# Altium PCB B049-140W-3C1A 外挂FTF屏1.3寸.PcbDoc (part 1 of 2)
Units mm, origin at the board's own origin, x right, y up, seen from the top; angles counter-clockwise.
Board outline 62.01 x 27.28 mm, 4 copper layers (Top Layer, Mid-Layer 1, Mid-Layer 2, Bottom Layer); 141 components, 212 nets, 519 pads, 593 vias.
Unrouted connection lines stored in the file: 27.
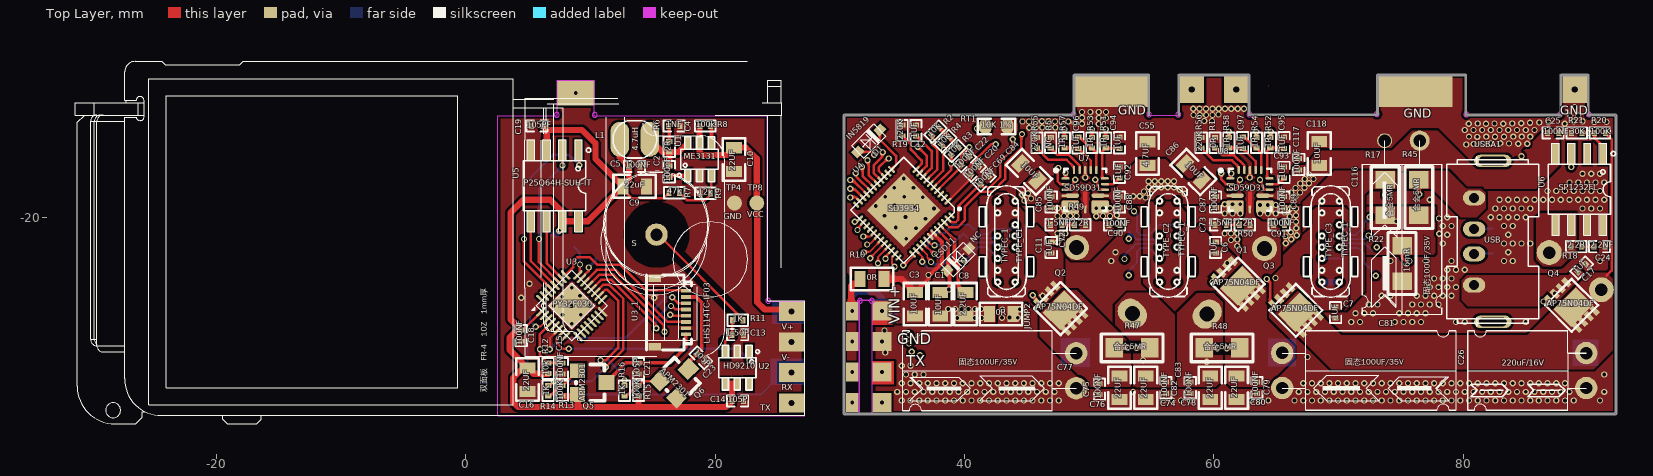
[diagram p0: Top Layer view]
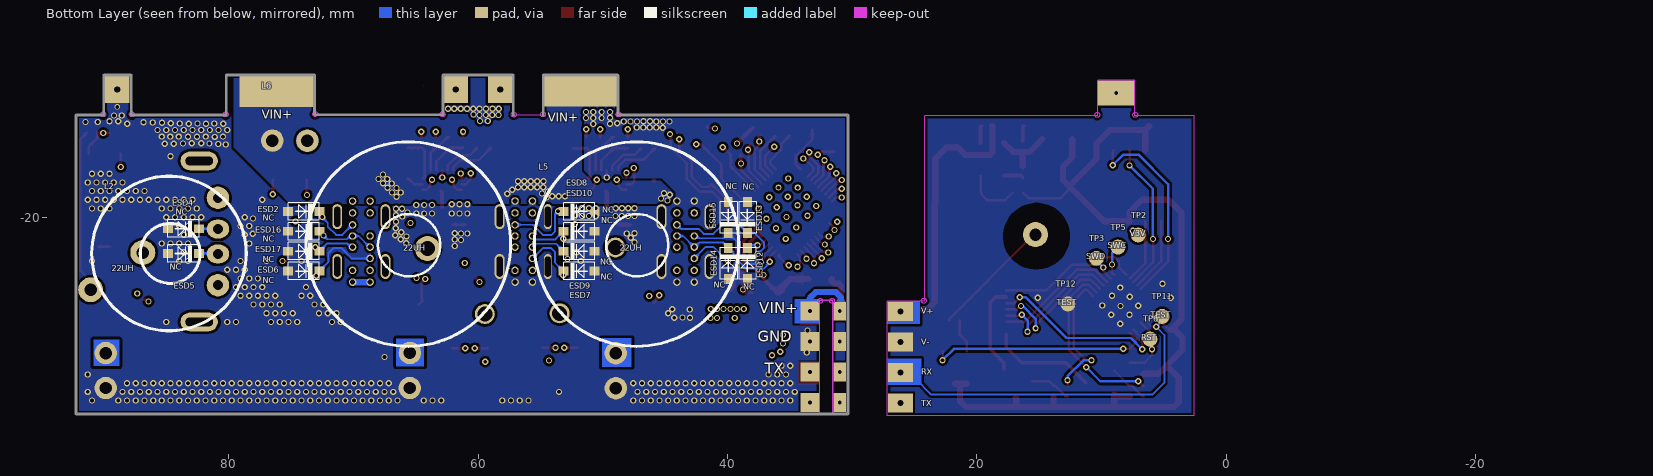
[diagram p1: Bottom Layer view, seen from below]
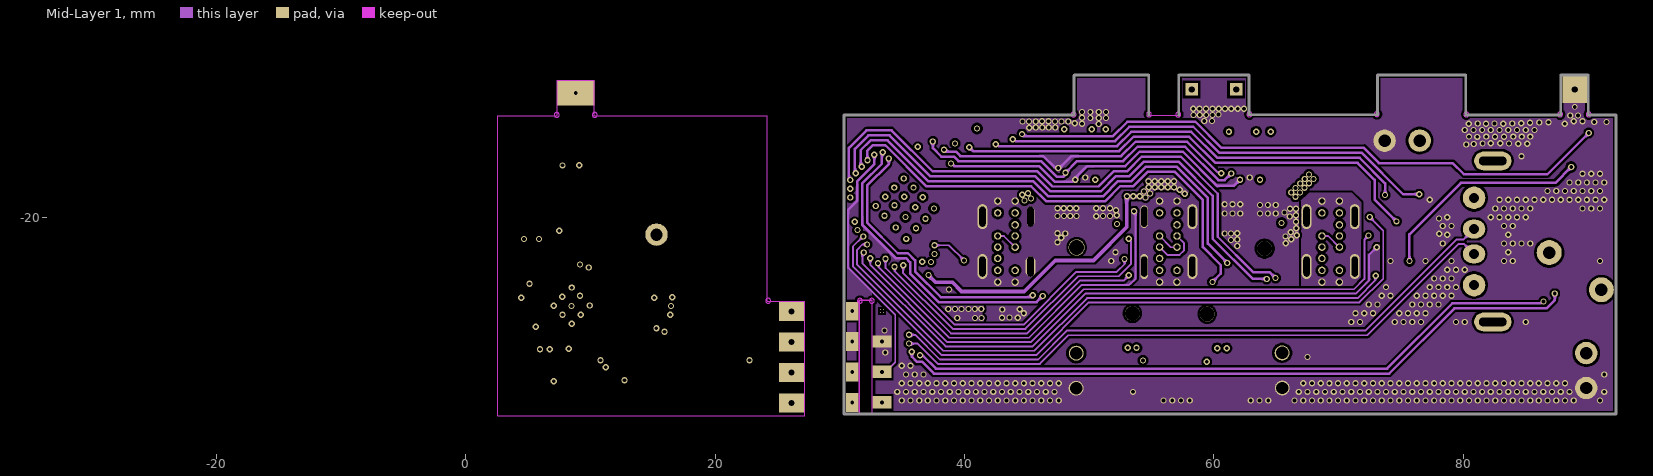
[diagram p2: Mid-Layer 1]
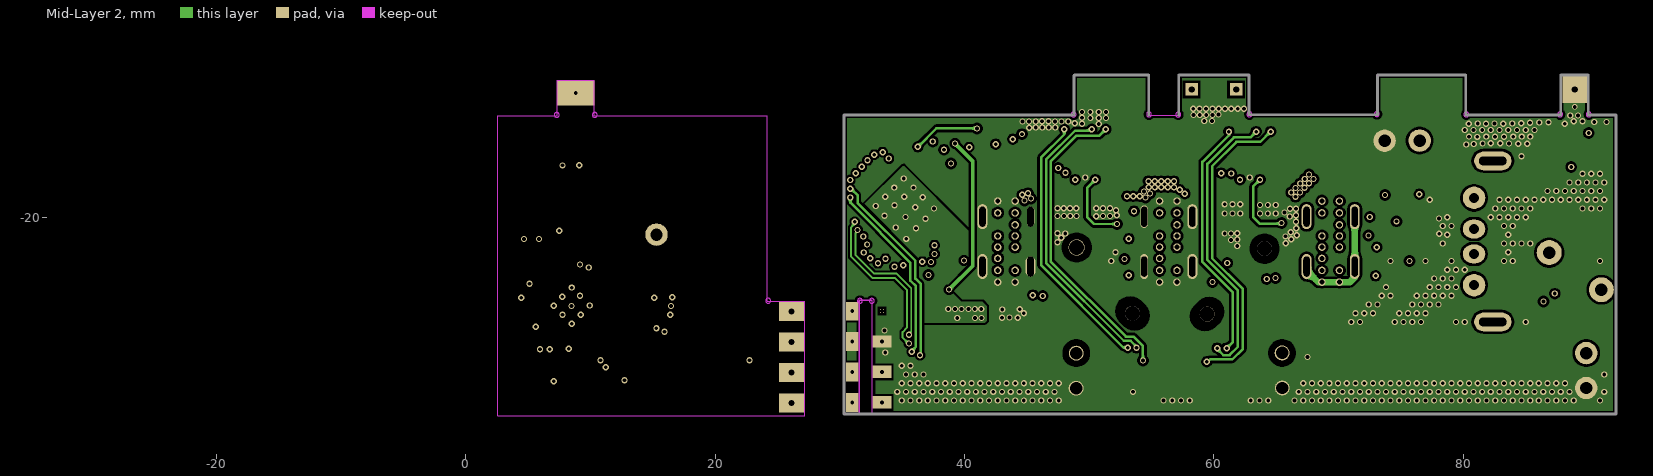
[diagram p3: Mid-Layer 2]

## Layer stack, top to bottom
Top Solder: solder mask 0.0102, Solder Resist, Dk 3.5
Top Layer: signal copper 0.0356
Dielectric 1: dielectric 0.32, FR-4, Dk 4.8
Mid-Layer 1: signal copper 0.0356
Dielectric2: dielectric 0.32, FR-4, Dk 4.8
Mid-Layer 2: signal copper 0.0356
Dielectric3: dielectric 0.32, FR-4, Dk 4.8
Bottom Layer: signal copper 0.0356
Bottom Solder: solder mask 0.0102, Solder Resist, Dk 3.5

## Board outline
30.289,-34.265 cw(c30.334,-34.242) 30.284,-34.242 30.284,-27.059 cw(c30.334,-27.059) 30.289,-27.037 30.289,-11.778 cw(c30.34,-11.778) 30.34,-11.728 48.739,-11.728 48.739,-8.578 cw(c48.79,-8.578) 48.79,-8.528 54.765,-8.528 cw(c54.765,-8.578) 54.815,-8.578 54.815,-11.778 cw(c54.765,-11.778) 54.714,-11.778 54.714,-8.629 48.84,-8.629 48.84,-11.778 cw(c48.79,-11.778) 48.79,-11.829 30.39,-11.829 30.39,-35.703 92.189,-35.703 92.189,-11.829 90.015,-11.829 cw(c90.015,-11.778) 89.964,-11.778 89.964,-8.629 87.865,-8.629 87.865,-11.778 cw(c87.815,-11.778) 87.815,-11.829 80.19,-11.829 cw(c80.19,-11.778) 80.139,-11.778 80.139,-8.629 73.165,-8.629 73.165,-11.753 cw(c73.115,-11.753) 73.115,-11.804 62.815,-11.804 cw(c62.815,-11.753) 62.764,-11.753 62.764,-8.629 57.24,-8.629 57.24,-11.778 cw(c57.19,-11.778) 57.139,-11.778 57.139,-8.578 cw(c57.19,-8.578) 57.19,-8.528 62.815,-8.528 cw(c62.815,-8.578) 62.865,-8.578 62.865,-11.703 73.064,-11.703 73.064,-8.578 cw(c73.115,-8.578) 73.115,-8.528 80.19,-8.528 cw(c80.19,-8.578) 80.24,-8.578 80.24,-11.728 87.764,-11.728 87.764,-8.578 cw(c87.815,-8.578) 87.815,-8.528 90.015,-8.528 cw(c90.015,-8.578) 90.065,-8.578 90.065,-11.728 92.24,-11.728 cw(c92.24,-11.778) 92.29,-11.778 92.29,-35.753 cw(c92.24,-35.753) 92.24,-35.804 30.34,-35.804 cw(c30.34,-35.753) 30.289,-35.753
cut-out: 31.565,-35.753 32.615,-35.753 32.615,-26.628 31.565,-26.628

## Design rules (kind name [scope] priority, off if disabled: settings)
Clearance [All] p1: gap=0.2 ignorepadtopadclearanceinfootprint=FALSE
ComponentClearance [All] p1: gap=0.05 collisioncheckmode=3 verticalgap=0.05 showdistances=FALSE
PlaneConnect [All] p1: planeconnectstyle=Direct reliefexpansion=0.508 reliefentries=4 reliefconductorwidth=0.254 reliefairgap=0.254
PolygonConnect [All] p1: connectstyle=Direct reliefconductorwidth=0.254 reliefentries=4 polygonreliefangle="90 Angle" airgapwidth=0.254
RoutingVias [All] p1: holewidth=0.3 width=0.5 viastyle="Through Hole" minholewidth=0.3 minwidth=0.5 maxholewidth=0.3 maxwidth=0.5
SolderMaskExpansion [All] p1: expansion=0.102 istentingtop=FALSE
Width [All] p1: maxlimit=1 minlimit=0.1 preferedwidth=0.2 minimp=50.000000 maximp=50.000000 favimp=50.000000
28 further rules are at their usual default settings.

## Components (designator, comment, footprint, x,y, rotation, side; value= is the part's Value field where it differs from the comment)
C1 "10UF" "C 0805_L" 38.06,-26.95 r90 top
C2 "100nF" "C 0402_L" 16.32,-16.33 r270 top
C3 "10UF" "C 0805_L" 36.03,-26.95 r90 top
C4 "1NF" "C 0402_L" 16.715,-12.66 r180 top
C5 "100NF" "C 0402_L" 13.54,-15.9 r180 top
C6 "1UF" "C 0402_L" 60.14,-22.41 r270 top
C7 "1UF" "C 0402_L" 69.76,-27.61 r90 top
C8 "2.2UF" "C 0805_L" 40.08,-26.95 r90 top
C9 "22uF" "C 0805_L" 13.55,-17.5 r180 top
C10 "22UF" "C 0805_L" 21.51,-15.35 r270 top
C11 "1UF" "C 0402_L" 46.958,-22.41 r270 top
C12 "1UF" "C 0402_L" 36.11,-13.02 r270 top
C13 "1-50P" "C 0402_L" 21.808,-29.39 r180 top
C14 "105P" "C 0402_L" 21.808,-34.71 r0 top
C15 "100NF" "C 0402_L" 7.74,-32.1 r90 top
C16 "22UF" "C 0805_L" 4.95,-33 r90 top
C17 "1UF" "C 0402_L" 89.49,-24.04 r225 top
C18 "100NF" "C 0402_L" 4.45,-29.47 r90 top
C19 "105PF" "C 0402_L" 5.73,-12.66 r180 top
C20 "100NF" "C 0402_L" 40.816,-16.223 r45 top
C21 "105P" "C 0402_L" 13.853,-32.1 r90 top
C22 "100NF" "C 0402_L" 40.037,-15.443 r45 top
C23 "105P" "C 0402_L" 18.852,-31.252 r135 top
C24 "2.2NF" "C 0402_L" 90.93,-22.33 r180 top
C25 "100NF" "C 0402_L" 87.21,-13.21 r180 top
C26 "220uF/16V" 6*8W 89.86,-33.67 r180 top
C55 "4.7UF" "C 0805_L" 54.68,-14.87 r90 top
C69 "100NF" "C 0402_L" 41.6,-17 r45 top
C72 "1.5NF" "C 0402_L" 47.357,-20.578 r0 top
C73 "1.5NF" "C 0402_L" 60.54,-20.578 r0 top
C74 "22UF" "C 0805_L" 54.54,-33.65 r90 top
C75 "100NF" "C 0402_L" 50.82,-33.76 r90 top
C76 "22UF" "C 0805_L" 52.43,-33.65 r90 top
C77 "固态100UF/35V" 6*12W#1 47.05,-35.49 r180 top locked
C78 "22UF" "C 0805_L" 59.71,-33.65 r90 top
C79 "100NF" "C 0402_L" 63.45,-33.65 r90 top
C80 "22UF" "C 0805_L" 61.82,-33.65 r90 top
C81 "固态100UF/35V" 6*12W#2 67.38,-35.47 r0 top
C82 "100NF" "C 0402_L" 56.15,-33.65 r90 top
C83 "100NF" "C 0402_L" 58.1,-33.65 r90 top
C84 "10UF" "C 0805_L" 45.168,-16.348 r315 top
C85 "100NF" "C 0402_L" 46.958,-18.758 r90 top
C86 "10UF" "C 0805_L" 58.35,-16.348 r315 top
C87 "100NF" "C 0402_L" 60.14,-18.758 r90 top
C88 "100NF" "C 0402_L" 52.427,-18.758 r90 top
C89 "100NF" "C 0402_L" 65.63,-18.758 r90 top
C90 "100NF" "C 0402_L" 52.037,-20.578 r180 top
C91 "100NF" "C 0402_L" 65.23,-20.578 r180 top
C92 "1UF" "C 0402_L" 52.427,-16.379 r90 top
C93 "1UF" "C 0402_L" 65.63,-16.379 r90 top
C94 "1UF" "C 0402_L" 52.427,-14 r90 top
C95 "1UF" "C 0402_L" 65.63,-13.995 r90 top
C96 "1UF" "C 0402_L" 49.112,-14 r90 top
C97 "1UF" "C 0402_L" 62.305,-13.995 r90 top
C116 "固态100UF/35V" 6*12W#3 71.89,-15.74 r270 top locked
C117 "100NF" "C 0402_L" 66.8,-15.73 r270 top
C118 "10UF" "C 0805_L" 68.45,-14.86 r270 top
D1 "IN5819" SOD-323 32.25,-13.92 r45 top
ESD2 "NC" SOD-323 74.08,-19.51 r180 bottom
ESD4 "NC" SOD-323 83.73,-20.89 r180 bottom
ESD5 "NC" SOD-323 83.73,-22.88 r180 bottom
ESD6 "NC" SOD-323 74.08,-24.29 r180 bottom
ESD7 "NC" SOD-323 51.8,-24.29 r0 bottom
ESD8 "NC" SOD-323 51.8,-19.51 r0 bottom
ESD9 "NC" SOD-323 51.8,-22.697 r0 bottom
ESD10 "NC" SOD-323 51.8,-21.103 r0 bottom
ESD11 "NC" SOD-323 39.56,-23.28 r225 top
ESD12 "NC" SOD-323 38.4,-23.78 r90 bottom
ESD13 "NC" SOD-323 38.4,-19.9 r270 bottom
ESD14 "NC" SOD-323 39.93,-23.78 r90 bottom
ESD15 "NC" SOD-323 39.93,-19.9 r270 bottom
ESD16 "NC" SOD-323 74.08,-21.103 r180 bottom
ESD17 "NC" SOD-323 74.08,-22.697 r180 bottom
JUMP2 "0R" "R 0805_L" 42.94,-27.73 r0 top
L1 "4.7uH" CD32 13.55,-13.72 r180 top
L2 "22UH" 040125 84.69,-22.878 r270 bottom locked
L5 "22UH" 050125#1 47.29,-22.128 r225 bottom locked
L6 "22UH" 050125#2 65.59,-22.128 r225 bottom locked
Q1 "AP75N04DF" DFN3*3 62.151,-25.374 r135 top
Q2 "AP75N04DF" DFN3*3 47.911,-27.334 r135 top
Q3 "AP75N04DF" DFN3*3 66.783,-27.472 r135 top
Q4 "AP75N04DF" DFN3*3 88.904,-27.071 r135 top
Q5 "APM2301" SOT23-MOS 9.64,-33.151 r270 top
Q6 "APM2301" SOT23-MOS 16.64,-33.26 r315 top
R1 "0R" "R 0402_L" 60.088,-14.02 r90 top
R2 "10K" "R 0402_L" 37.68,-13.08 r225 top
R3 "10K" "R 0402_L" 39.26,-14.65 r225 top
R4 "10K" "R 0402_L" 38.48,-13.85 r225 top
R5 "NC" "R 0402_L" 46.907,-14.025 r90 top
R6 "2R" "R 0402_L" 16.32,-14.29 r270 top
R7 "47k" "R 0402_L" 16.74,-18.01 r180 top
R8 "100k" "R 0402_L" 19.22,-12.66 r180 top
R9 "12k" "R 0402_L" 19.17,-18.05 r0 top
R10 "0R" "R 0805_L" 32.58,-24.93 r0 top
R11 "1K" "R 0402_L" 21.783,-28.24 r0 top
R12 "10k" "R 0402_L" 6.61,-32.075 r270 top
R13 "100K" "R 0402_L" 7.74,-33.873 r270 top
R14 "1K" "R 0402_L" 6.61,-33.873 r270 top
R15 "100K" "R 0402_L" 13.854,-33.873 r270 top
R16 "1K" "R 0402_L" 12.724,-33.873 r270 top
R17 "合金5MR" "R 1206_L" 73.74,-18.378 r270 top
R18 "2.2R" "R 0402_L" 89.04,-22.33 r0 top
R19 "220K" "R 0402_L" 35,-12.99 r270 top
R20 "100K" "R 0402_L" 90.935,-13.21 r0 top
R21 "30K" "R 0402_L" 89.12,-13.21 r180 top
R22 "16mR" "R 1206_L" 75.09,-23.71 r90 top
R45 "合金5MR" "R 1206_L" 76.43,-18.378 r270 top
R47 "合金5MR" "R 1206_L" 53.42,-30.45 r0 top
R48 "合金5MR" "R 1206_L" 60.68,-30.45 r180 top
R49 "2.2R" "R 0402_L" 49.288,-20.578 r180 top
R50 "2.2R" "R 0402_L" 62.49,-20.578 r180 top
R51 "1R" "R 0402_L" 51.318,-13.975 r270 top
R52 "1R" "R 0402_L" 64.522,-13.97 r270 top
R53 "1R" "R 0402_L" 50.215,-13.975 r270 top
R54 "1R" "R 0402_L" 63.413,-13.97 r270 top
R55 "220K" "R 0402_L" 45.804,-14.025 r90 top
R56 "220K" "R 0402_L" 58.98,-14.02 r90 top
R57 "1R" "R 0402_L" 48.01,-13.975 r270 top
R58 "1R" "R 0402_L" 61.197,-13.97 r270 top
RT1 "10K 1%" NTC1 42.52,-12.69 r0 top
TP2 "V3V" 焊盘1.5*2.5mm 7.06,-21.4 r180 bottom
TP3 "SWD" 焊盘1.5*2.5mm 10.42,-23.27 r180 bottom
TP4 "GND" 焊盘1.5*2.5mm 21.55,-18.84 r0 top
TP5 "SWC" 焊盘1.5*2.5mm 8.69,-22.37 r180 bottom
TP6 "RST" 焊盘1.5*2.5mm 6.12,-29.75 r180 bottom
TP8 "VCC" 焊盘椭圆 23.34,-18.84 r0 top
TP11 "TEST" 焊盘椭圆 5.14,-27.93 r180 bottom
TP12 "TEST" 焊盘椭圆 12.7,-26.93 r180 bottom
TYPE_C1 "TYPEC_1" "TP-14pin 180°"#1 43.365,-21.93 r90 top locked
TYPE_C2 "TYPEC_1" "TP-14pin 180°"#2 56.34,-21.93 r90 top locked
TYPE_C3 "TYPEC_1" "TP-14pin 180°"#3 69.365,-21.93 r90 top locked
U1 "ME3131" SOT23-6 18.77,-15.33 r90 top
U2 "HD9210" SOT23-6 21.76,-32.03 r270 top
U3 "PY32F030" "QFN32 4*4" 6.025,-27.565 r315 top
U3_1 "LHS114TC-IF03" FPC-SMD_8P-P0.BD_FPC-SMD_8P-P0.BD() 16.398,-27.618 r90 top locked (schematic designator U3)
U4 "SD3934" QFN52L6*6 35.05,-20.14 r135 top
U5 "P25Q64H-SUH-IT" SOP8 7.2,-17.48 r270 top
U6 "SP1232FL" SOP8 89.38,-17.76 r270 top
U7 "SD59D31" SD59D31_QFN16 49.728,-17.898 r180 top
U8 "SD59D31" SD59D31_QFN16 62.94,-17.898 r180 top
USBA1 "USB" "USB180 10mm" 82.365,-21.921 r270 top locked

## Footprints (in the part's own frame and the unit in brackets; to place one, negate y for a bottom-side part, rotate by r counter-clockwise, add the part's x,y. Pads: shape width x height; smd on the part's side, far side on the other; paste and mask are expansions set on the pad)
6*8W [mm]
  round 1.8 hole 1: 1(0,-2.8) 2(0,0)
  silkscreen extent 0,-4.6 9.5,1.8
6*12W#1 [mm]
  round 1.8 / inner round 1.2 / far side round 1.8 hole 1: 1(-1.91,-4.61) 2(-1.9,-1.8)
  silkscreen extent -1.91,-6.4 12,0
6*12W#2 [mm]
  round 1.8 / inner round 1.2 / far side round 1.8 hole 1: 1(-1.91,4.61) 2(-1.9,1.8)
  silkscreen extent -1.91,0 12,6.4
6*12W#3 [mm]
  round 1.6 / inner round 1.8 / far side round 1.8 hole 1: 1(-1.91,4.61)
  round 1.2 / inner round 1.8 / far side round 1.8 hole 1: 2(-1.9,1.8)
  silkscreen extent -1.91,0 12,6.4
040125 [mm]
  round 2 hole 1: 1(-0.068,-2.2) 2(2.912,-6.38)
  silkscreen extent -6.2,-6.3 6.2,6.1
050125#1 [mm]
  round 1.6 / inner round 1.3 / far side round 2 hole 1.2: 1(-1.01,-1.394)
  round 1.6 / inner round 1.2 / far side oval 2x2.5 hole 1.2: 2(-0.437,-8.289)
  silkscreen extent -8.2,-8.2 8.2,8.2
050125#2 [mm]
  round 2 / inner round 1.2 / far side round 2 hole 1.2: 1(1.338,0.826)
  round 1.6 / inner round 1.2 / far side oval 2.5x2 hole 1.2: 2(8.303,0.366)
  silkscreen extent -8.2,-8.2 8.2,8.2
"C 0402_L" [mm] "无极性贴片电容         淘宝ID:黄晶宝石"
  rect 0.4x0.5 smd: 1(-0.45,0) 2(0.45,0)
  silkscreen extent -0.85,-0.45 0.85,0.45, body extent -0.5,-0.26 0.5,0.26, height 0.53
"C 0805_L" [mil] "无极性贴片电容                                        淘宝ID:黄晶宝石"
  rect 35x50 smd: 1(-37.4,0) 2(37.4,0)
  silkscreen extent -67,-36 67,36, body extent -39,-24 39,24, height 20
CD32 [mm]
  oval 1.5x2.8 smd: 1(-1.21,0.008) 2(1.19,0.008)
  silkscreen extent -1.76,-1.49 1.74,1.51, body extent -1.78,-1.52 1.63,1.48, height 2.15
DFN3*3 [mm]
  rect 0.8x0.4 smd: D(-1.425,-0.225) D(-1.425,-0.875) D(-1.425,0.425) D(-1.425,1.075) G(1.775,1.075) S(1.775,-0.875) S(1.775,0.425) S(1.775,-0.225)
  rect 2x2.5 smd: D(-0.025,0.125)
  silkscreen extent -1.33,-1.38 1.67,1.62, body extent -1.42,-1.43 1.78,1.67, height 0.8
FPC-SMD_8P-P0.BD_FPC-SMD_8P-P0.BD() [mm]
  rect 0.3x0.8 smd: 1(-1.75,-1.25) 2(-1.25,-1.25) 3(-0.75,-1.25) 4(-0.25,-1.25) 5(0.25,-1.25) 6(0.75,-1.25) 7(1.25,-1.25) 8(1.75,-1.25)
  rect 0.6x1 smd: 9(-2.75,1.25) 10(2.75,1.25)
  silkscreen extent -3,-1.71 3,1.91
NTC1 [mm]
  oval 1x1.3 smd: 1(-0.84,0) 2(0.91,0)
  silkscreen extent -1.47,-0.63 1.53,0.62
"QFN32 4*4" [mm]
  oval 0.2x1 smd: 1(0,0) 2(0.4,0) 3(0.8,0) 4(1.2,0) 5(1.6,0) 6(2,0) 7(2.4,0) 8(2.8,0) 17(2.8,4.2) 18(2.4,4.2) 19(2,4.2) 20(1.6,4.2) 21(1.2,4.2) 22(0.8,4.2) 23(0.4,4.2) 24(0,4.2)
  oval 1x0.2 smd: 9(3.5,0.7) 10(3.5,1.1) 11(3.5,1.5) 12(3.5,1.9) 13(3.5,2.3) 14(3.5,2.7) 15(3.5,3.1) 16(3.5,3.5) 25(-0.7,3.5) 26(-0.7,3.1) 27(-0.7,2.7) 28(-0.7,2.3) 29(-0.7,1.9) 30(-0.7,1.5) 31(-0.7,1.1) 32(-0.7,0.7)
  rect 2.6x2.6 smd: 33(1.4,2.1)
  silkscreen extent -0.6,-0.42 3.4,4.1, body extent -0.59,0.09 3.41,4.09, height 0.57
QFN52L6*6 [mm]
  rect 4.2x4.2 smd: 0(0.47,-0.58)
  oval 0.2x0.6 on Top Overlay: 1(-1.93,-3.58) 13(2.87,-3.58) 27(2.87,2.42)
  oval 0.2x0.7 smd: 2(-1.53,-3.58) 3(-1.13,-3.58) 4(-0.73,-3.58) 5(-0.33,-3.58) 6(0.07,-3.58) 7(0.47,-3.58) 8(0.87,-3.58) 9(1.27,-3.58) 10(1.67,-3.58) 11(2.07,-3.58) 28(2.47,2.42) 29(2.07,2.42) 30(1.67,2.42) 31(1.27,2.42) 32(0.87,2.42) 33(0.47,2.42) 34(0.07,2.42) 35(-0.33,2.42) 36(-0.73,2.42) 37(-1.13,2.42) 38(-1.53,2.42)
  oval 0.2x0.7 on Top Overlay: 12(2.47,-3.58)
  oval 0.6x0.2 on Top Overlay: 14(3.47,-2.98) 40(-2.53,1.82)
  oval 0.7x0.2 on Top Overlay: 15(3.47,-2.58)
  oval 0.7x0.2 smd: 16(3.47,-2.18) 17(3.47,-1.78) 18(3.47,-1.38) 19(3.47,-0.98) 20(3.47,-0.58) 21(3.47,-0.18) 22(3.47,0.22) 23(3.47,0.62) 24(3.47,1.02) 25(3.47,1.42) 41(-2.53,1.42) 42(-2.53,1.02) 43(-2.53,0.62) 44(-2.53,0.22) 45(-2.53,-0.18) 46(-2.53,-0.58) 47(-2.53,-0.98) 48(-2.53,-1.38) 49(-2.53,-1.78) 50(-2.53,-2.18) 51(-2.53,-2.58)
  oval 0.6x0.2 smd: 26(3.47,1.82) 52(-2.53,-2.98)
  oval 0.2x0.6 smd: 39(-1.93,2.42)
  silkscreen extent -2.73,-3.91 3.47,2.42, body extent -2.58,-3.58 3.42,2.42, height 0.9
"R 0402_L" [mm] "1/16W贴片电阻     淘宝ID:黄晶宝石"
  rect 0.4x0.5 smd: 1(-0.4,0) 2(0.45,0)
  silkscreen extent -0.8,-0.45 0.85,0.45, body extent -0.5,-0.25 0.5,0.25, height 0.3
"R 0805_L" [mil] "1/8W贴片电阻"
  rect 35x50 smd: 1(-37.4,0) 2(37.4,0)
  silkscreen extent -67,-36 67,36, body extent -39,-25 39,25, height 20
"R 1206_L" [mil] "1/4W贴片电阻"
  rect 55x62 smd: 1(-55.12,0) 2(57.09,0)
  silkscreen extent -96,-44 98,44, body extent -63,-31 63,32, height 22
SD59D31_QFN16 [mm]
  oval 0.65x0.2 smd: 1(1.623,-1.031) 2(1.623,-0.581) 3(1.623,-0.131) 4(1.623,0.344) 8(-1.527,0.344) 9(-1.527,-0.131) 10(-1.527,-0.581) 11(-1.527,-1.031)
  oval 1.075x0.35 smd: 4(1.089,0.344) 8(-0.994,0.344)
  rrect30% 1.4x1.075 smd: 5(1.248,1.254) 7(-1.152,1.254)
  oval 0.2x0.65 smd: 6(0.048,1.444) 12(-0.852,-1.706) 13(-0.402,-1.706) 14(0.048,-1.706) 15(0.498,-1.706) 16(0.948,-1.706)
  Top Layer region: 0.223,1.368 -0.127,1.368 -0.127,0.047 0.223,0.047
  Top Layer region: 0.223,0.047 0.058,-0.118 -0.127,-0.118 -0.127,0.047
  silkscreen extent -1.65,-1.83 2.52,1.57, body extent -1.48,-1.66 1.62,1.44, height 0.85
SOD-323 [mm]
  rect 0.8x0.7 smd: 1(-1.15,0) 2(1.35,0)
  silkscreen extent -1.15,-0.7 1.35,0.7, body extent -1.19,-0.65 1.41,0.65, height 1
SOP8 [mm]
  rect 1.7x0.6 smd: 1(-2.875,1.83) 2(-2.875,0.56) 3(-2.875,-0.71) 4(-2.875,-1.98) 5(2.825,-1.98) 6(2.825,-0.71) 7(2.825,0.56) 8(2.825,1.83)
  silkscreen extent -3.73,-2.58 3.68,2.83, body extent -3.01,-2.52 2.99,2.38, height 1.7
SOT23-6 [mm]
  rect 1x0.5 smd: 1(-1.298,0.964) 2(-1.298,0.014) 3(-1.298,-0.936) 4(1.302,-0.936) 5(1.302,0.014) 6(1.302,0.964)
  silkscreen extent -1.8,-1.49 1.8,1.8, body extent -1.16,-1.37 1.26,1.43, height 1.09
SOT23-MOS [mm]
  rect 1.2x1.3 smd: D(0.075,1.64)
  rect 1.2x1.2 smd: G(-0.865,-0.66) S(1.04,-0.66)
  silkscreen extent -1.37,-0.79 1.55,1.5, body extent -1.41,-0.79 1.59,1.76, height 1
"TP-14pin 180°"#1 [mm]
  round 0.6 hole 0.4: A1(-3.25,0.7) A4(-2.3,0.7) A5(-1.35,0.7) A6(-0.45,0.7) A7(0.45,0.7) A9(2.3,0.7) A12(3.25,0.7) B1(3.25,-0.7) B4(2.3,-0.7) B5(1.35,-0.7) B6(0.45,-0.7) B7(-0.45,-0.7) B9(-2.3,-0.7) B12(-3.25,-0.69)
  oval 1.6x0.6 / inner oval 1.6x0.8 / far side oval 2x0.8 hole 0.5 slot 1.6 at 0 deg: ""(-2,-1.93)
  oval 1.6x0.6 / inner oval 2x0.8 / far side oval 2x0.8 hole 0.5 slot 1.6 at 0 deg: ""(-2,1.93) ""(2,1.93)
  oval 1.6x0.6 / inner oval 1.6x0.6 / far side oval 2x0.8 hole 0.5 slot 1.6 at 0 deg: ""(2,-1.93)
  silkscreen extent -4.46,-2.18 4.47,2.18, body extent -4.5,-1.98 4.5,2.02, height 10
"TP-14pin 180°"#2 [mm]
  round 0.6 hole 0.4: A1(-3.25,0.7) A4(-2.3,0.7) A5(-1.35,0.7) A6(-0.45,0.7) A7(0.45,0.7) A9(2.3,0.7) A12(3.25,0.7) B1(3.25,-0.7) B4(2.3,-0.7) B5(1.35,-0.7) B6(0.45,-0.7) B7(-0.45,-0.7) B9(-2.3,-0.7) B12(-3.25,-0.69)
  oval 1.6x0.6 / inner oval 2x0.8 / far side oval 2x0.8 hole 0.5 slot 1.6 at 0 deg: ""(-2,-1.93) ""(2,-1.93)
  oval 1.6x0.6 / inner oval 2x0.6 / far side oval 2x0.6 hole 0.5 slot 1.6 at 0 deg: ""(-2,1.93)
  oval 1.6x0.6 / inner oval 1.8x0.6 / far side oval 2x0.6 hole 0.5 slot 1.6 at 0 deg: ""(2,1.93)
  silkscreen extent -4.46,-2.18 4.47,2.18, body extent -4.5,-1.98 4.5,2.02, height 10
"TP-14pin 180°"#3 [mm]
  round 0.6 hole 0.4: A1(-3.25,0.7) A4(-2.3,0.7) A5(-1.35,0.7) A6(-0.45,0.7) A7(0.45,0.7) A9(2.3,0.7) A12(3.25,0.7) B1(3.25,-0.7) B4(2.3,-0.7) B5(1.35,-0.7) B6(0.45,-0.7) B7(-0.45,-0.7) B9(-2.3,-0.7) B12(-3.25,-0.69)
  oval 1.6x0.6 / inner oval 2x0.8 / far side oval 2x0.8 hole 0.5 slot 1.6 at 0 deg: ""(-2,-1.93) ""(-2,1.93) ""(2,-1.93) ""(2,1.93)
  silkscreen extent -4.46,-2.18 4.47,2.18, body extent -4.5,-1.98 4.5,2.02, height 10
"USB180 10mm" [mm]
  oval 1.2x1.8 / inner round 1.8 / far side round 1.8 hole 0.8: 1(3.5,-1.5) 4(-3.5,-1.5)
  oval 1.2x1.8 / inner oval 1.5x1.8 / far side oval 1.5x1.8 hole 0.8: 2(1,-1.5) 3(-1,-1.5)
  oval 1x3 / inner oval 1.5x3 / far side oval 1.5x3 hole 0.7 slot 2.2 at 90 deg: ""(-6.46,0) ""(6.45,0)
  silkscreen extent -6.8,-3.7 6.8,3.7, body extent -6.6,-3.02 6.6,2.98, height 10
焊盘1.5*2.5mm [mm]
  round 1.2 smd: 1(0,0)
焊盘椭圆 [mm]
  round 1.2 smd: 1(0,0)

## Part data
C1: library part C-CC, "贴片电容：10UF/10V-X5R-0805", PART NUMBER=003-, TOLERANCE=+-??%, Voltage Rating=??V, LatestRevisionDate=17-Jul-2002, LatestRevisionNote="Re-released for DXP Platform.", PackageDescription="Radial Cap, Thru-Hole; 2 Leads; 0.3 in Pin Spacing", PackageReference=RAD-0.3, PART DESC="CERAMIC CAP", PCB DECAL=CCV5S, Published=8-Jun-2000, Publisher="Altium Limited"
C2: library part 22nF, "贴片电容：100NF/25V-X7R-0402", Contributor=LCEDA_Lib, nameAlias=Value(F), spicePre=C, spiceSymbolName=C_0603_US
C3: library part C-CC, "贴片电容：10UF/50V-X5R-0805", PART NUMBER=003-, TOLERANCE=+-??%, Voltage Rating=??V, LatestRevisionDate=17-Jul-2002, LatestRevisionNote="Re-released for DXP Platform.", PackageDescription="Radial Cap, Thru-Hole; 2 Leads; 0.3 in Pin Spacing", PackageReference=RAD-0.3, PART DESC="CERAMIC CAP", PCB DECAL=CCV5S, Published=8-Jun-2000, Publisher="Altium Limited"
C4: library part C0402, "贴片电容：1NF/50V-X7R-0402", Comment_1=C0402, PCB DECAL=0402
C5 C18: library part 0.1u, "贴片电容：100NF/10V-X5R-0402", Add into BOM=yes, Convert to PCB=yes, Device=0.1u, FootprintName=C0603, ModelId=ac9b32e974bc448eab36b1293f859dcb, ModelName=C0603_L1.6-W0.8-H0.8, ModelTransform=v2:[39.37007874015748,0,0,0,39.37007874015748,0,0,0,39.37007874015748,0.001,0,0], SymbolName=0.1u
  C5: UniqueId=ggeef7817906d228245
  C18: UniqueId=gge4f251fc7ae9908d9
C6 C7 C11 C12 C17 C96 C97: library part C-CC, "贴片电容：1UF/50V-X7R-0402", PART NUMBER=003-, TOLERANCE=+-??%, Voltage Rating=??V, PART DESC="CERAMIC CAP", PCB DECAL=CCV5S
  C6 C7 C11 C17 C96 C97: LatestRevisionDate=17-Jul-2002, LatestRevisionNote="Re-released for DXP Platform.", PackageDescription="Radial Cap, Thru-Hole; 2 Leads; 0.3 in Pin Spacing", PackageReference=RAD-0.3, Published=8-Jun-2000, Publisher="Altium Limited"
C8: library part C-CC, "贴片电容：2.2UF/10V-X5R-0805", PART NUMBER=003-, TOLERANCE=+-??%, Voltage Rating=??V, LatestRevisionDate=17-Jul-2002, LatestRevisionNote="Re-released for DXP Platform.", PackageDescription="Radial Cap, Thru-Hole; 2 Leads; 0.3 in Pin Spacing", PackageReference=RAD-0.3, PART DESC="CERAMIC CAP", PCB DECAL=CCV5S, Published=8-Jun-2000, Publisher="Altium Limited"
C9: "贴片电容：22UF/10V-X7R-0805", Contributor=LCEDA_Lib, nameAlias=Value(F), spicePre=C, spiceSymbolName=C_0805_US
C10: library part 10uF, "贴片电容：22UF/35V-X7R-0805", Contributor=LCEDA_Lib, nameAlias=Value(F), spicePre=C, spiceSymbolName=C_0603_US
C13 C14 C21 C23: library part CAP, "贴片电容：105P/10V-X5R-0402"
C15: library part 10uF, "贴片电容：100NF/10V-X7R-0805", Add into BOM=yes, Convert to PCB=yes, Device=10uF, FootprintName=C0603, ModelId=ac9b32e974bc448eab36b1293f859dcb, ModelName=C0603_L1.6-W0.8-H0.8, ModelTransform=v2:[39.37007874015748,0,0,0,39.37007874015748,0,0,0,39.37007874015748,0.001,0,0], SymbolName=10uF, UniqueId=gge1e13a888c85ebaed
C16: library part 10uF, "贴片电容：22UF/10V-X7R-0805", Add into BOM=yes, Convert to PCB=yes, Device=10uF, FootprintName=C0603, ModelId=ac9b32e974bc448eab36b1293f859dcb, ModelName=C0603_L1.6-W0.8-H0.8, ModelTransform=v2:[39.37007874015748,0,0,0,39.37007874015748,0,0,0,39.37007874015748,0.001,0,0], SymbolName=10uF, UniqueId=gge2649e10512dd5dd7
C19: library part 0.1u, "贴片电容：105P/10V-X5R-0402", Add into BOM=yes, Convert to PCB=yes, Device=0.1u, FootprintName=C0603, ModelId=ac9b32e974bc448eab36b1293f859dcb, ModelName=C0603_L1.6-W0.8-H0.8, ModelTransform=v2:[39.37007874015748,0,0,0,39.37007874015748,0,0,0,39.37007874015748,0.001,0,0], SymbolName=0.1u, UniqueId=ggeeecb535e2993774a
C20 C22 C69 C85 C87 C88 C89 C90 C91 C117: library part C-CC, "贴片电容：100NF/50V-X7R-0402", PART NUMBER=003-, TOLERANCE=+-??%, Voltage Rating=??V, PART DESC="CERAMIC CAP", PCB DECAL=CCV5S
  C20 C22 C69 C85 C87 C88 C89 C90 C91: LatestRevisionDate=17-Jul-2002, LatestRevisionNote="Re-released for DXP Platform.", PackageDescription="Radial Cap, Thru-Hole; 2 Leads; 0.3 in Pin Spacing", PackageReference=RAD-0.3, Published=8-Jun-2000, Publisher="Altium Limited"
C24: library part Cap, "贴片电容：2.2NF/50V-X7R-0402", LatestRevisionDate=17-Jul-2002, LatestRevisionNote="Re-released for DXP Platform.", PackageDescription="Radial Cap, Thru-Hole; 2 Leads; 0.3 in Pin Spacing", PackageReference=RAD-0.3, Published=8-Jun-2000, Publisher="Altium Limited"
C25: library part Cap, "贴片电容：100NF/50V-X7R-0402", LatestRevisionDate=17-Jul-2002, LatestRevisionNote="Re-released for DXP Platform.", PackageDescription="Radial Cap, Thru-Hole; 2 Leads; 0.3 in Pin Spacing", PackageReference=RAD-0.3, Published=8-Jun-2000, Publisher="Altium Limited"
C26: library part "Cap Pol2", "电解电容：220UF/16V 6.3*8mm", LatestRevisionDate=17-Jul-2002, LatestRevisionNote="Re-released for DXP Platform.", PackageDescription="Polarized Capacitor; 2 Leads", PackageReference=POLAR0.8, Published=8-Jun-2000, Publisher="Altium Limited"
C55: library part C-CC, "贴片电容：4.7UF/25V-X5R-0805", PART NUMBER=003-, TOLERANCE=+-??%, Voltage Rating=??V, LatestRevisionDate=17-Jul-2002, LatestRevisionNote="Re-released for DXP Platform.", PackageDescription="Radial Cap, Thru-Hole; 2 Leads; 0.3 in Pin Spacing", PackageReference=RAD-0.3, PART DESC="CERAMIC CAP", PCB DECAL=CCV5S, Published=8-Jun-2000, Publisher="Altium Limited"
C72 C73: library part C-CC, "贴片电容：1.5NF/50V-X7R-0402", PART NUMBER=003-, TOLERANCE=+-??%, Voltage Rating=??V, PART DESC="CERAMIC CAP", PCB DECAL=CCV5S
C74 C76 C78 C80: library part C-CC, "22UF/25V-X5R-0805", PART NUMBER=003-, TOLERANCE=+-??%, Voltage Rating=??V, LatestRevisionDate=17-Jul-2002, LatestRevisionNote="Re-released for DXP Platform.", PackageDescription="Radial Cap, Thru-Hole; 2 Leads; 0.3 in Pin Spacing", PackageReference=RAD-0.3, PART DESC="CERAMIC CAP", PCB DECAL=CCV5S, Published=8-Jun-2000, Publisher="Altium Limited"
C75 C79 C82 C83: library part C-CC, "贴片电容：100NF/25V-X7R-0402", PART NUMBER=003-, TOLERANCE=+-??%, Voltage Rating=??V, LatestRevisionDate=17-Jul-2002, LatestRevisionNote="Re-released for DXP Platform.", PackageDescription="Radial Cap, Thru-Hole; 2 Leads; 0.3 in Pin Spacing", PackageReference=RAD-0.3, PART DESC="CERAMIC CAP", PCB DECAL=CCV5S, Published=8-Jun-2000, Publisher="Altium Limited"
C77 C81 C116: library part C-CE, "插件固态电容：100UF/35V -6*12", PCB DECAL=CE6X11
C84 C86: library part C-CC, "贴片电容：10UF/25V-X7R-0805", PART NUMBER=003-, TOLERANCE=+-??%, Voltage Rating=??V, LatestRevisionDate=17-Jul-2002, LatestRevisionNote="Re-released for DXP Platform.", PackageDescription="Radial Cap, Thru-Hole; 2 Leads; 0.3 in Pin Spacing", PackageReference=RAD-0.3, PART DESC="CERAMIC CAP", PCB DECAL=CCV5S, Published=8-Jun-2000, Publisher="Altium Limited"
C92 C93: library part C-CC, "贴片电容：1UF/10V-X7R-0402", PART NUMBER=003-, TOLERANCE=+-??%, Voltage Rating=??V, LatestRevisionDate=17-Jul-2002, LatestRevisionNote="Re-released for DXP Platform.", PackageDescription="Radial Cap, Thru-Hole; 2 Leads; 0.3 in Pin Spacing", PackageReference=RAD-0.3, PART DESC="CERAMIC CAP", PCB DECAL=CCV5S, Published=8-Jun-2000, Publisher="Altium Limited"
C94 C95: library part C-CC, "贴片电容：1UF/25V-X7R-0402", PART NUMBER=003-, TOLERANCE=+-??%, Voltage Rating=??V, LatestRevisionDate=17-Jul-2002, LatestRevisionNote="Re-released for DXP Platform.", PackageDescription="Radial Cap, Thru-Hole; 2 Leads; 0.3 in Pin Spacing", PackageReference=RAD-0.3, PART DESC="CERAMIC CAP", PCB DECAL=CCV5S, Published=8-Jun-2000, Publisher="Altium Limited"
C118: library part C-CC, "贴片电容：10UF/50V-X7R-0805", PART NUMBER=003-, TOLERANCE=+-??%, Voltage Rating=??V, PART DESC="CERAMIC CAP", PCB DECAL=CCV5S
D1: library part D1
ESD2 ESD4 ESD5 ESD6 ESD7 ESD8 ESD9 ESD10 ESD11 ESD12 ESD13 ESD14 ESD15 ESD16 ESD17: library part ESD1
  ESD2 ESD6 ESD11 ESD16 ESD17: PCB DECAL=0603-CAP
  ESD4 ESD5 ESD7 ESD8 ESD9 ESD10 ESD12 ESD13 ESD14 ESD15: PCB DECAL=DIODE\SMD
JUMP2: library part J, "贴片电阻：0R-0805-F", PCB DECAL=JP5
L1: "贴片电感：0420-4.7UH", Manufacturer=Sunlord, Manufacturer Part=MPH252012S4R7MT, nameAlias=Inductance, spicePre=L, spiceSymbolName=MPH252012S4R7MT, Supplier=LCSC, Supplier Part=C90256
L2: library part L, "磁环电感：040125 22UH 0.7线径 立式加套管"
L5 L6: library part IND-UPRIGHT, "磁环电感：050125-22UH-1.2线径卧套", Code_IEC=1005, Code_JEITA=0402, LatestRevisionDate=29-May-2009, LatestRevisionNote="IPC-7351 Footprint Added.", PackageDescription="Chip Inductor", PackageReference=0402-A, PCB DECAL=FC5T5A, Published=8-Jun-2000, Publisher="Altium Limited"
Q1 Q2 Q3 Q4: library part NMOS, "贴片MOS:AP75N04DF-3*3", PCB DECAL=DFN5_6
Q5 Q6: library part MOS_P, "贴片MOS：APM2301-SOT23-3"
R1: library part RES, "贴片电阻：0R-0402-F", Manufacturer="Generic Components", Class=Passive, PCB DECAL=0603-RES, Published=08/06/2000, Publisher="Altium Hobart Technology Centre", SubClass=Resistor
R2 R3 R4: library part RES, "贴片电阻：10K-0402-F", Manufacturer="Generic Components", Class=Passive, PCB DECAL=0603-RES, Published=08/06/2000, Publisher="Altium Hobart Technology Centre", SubClass=Resistor
R5: library part RES, Manufacturer="Generic Components", Class=Passive, PCB DECAL=0603-RES, Published=08/06/2000, Publisher="Altium Hobart Technology Centre", SubClass=Resistor
R6: library part R0402, "贴片电阻：2R-0402-F", Comment_1=R0402, PCB DECAL=0402
R7: library part 75k, "贴片电阻：47K-0402-1%", Contributor=LCEDA_Lib, nameAlias=Value(Ω), spicePre=R, spiceSymbolName=R_0603_US
R8: "贴片电阻：100K-0402-1%", Contributor=LCEDA_Lib, nameAlias=Value(Ω), spicePre=R, spiceSymbolName=R_0603_US
R9: library part 10k, "贴片电阻：12K-0402-1%", Contributor=LCEDA_Lib, nameAlias=Value(Ω), spicePre=R, spiceSymbolName=R_0603_US
R10: library part RES, "贴片电阻：0R-0805-F", Manufacturer="Generic Components", Class=Passive, PCB DECAL=0603-RES, Published=08/06/2000, Publisher="Altium Hobart Technology Centre", SubClass=Resistor
R11 R14 R16: library part R, "贴片电阻：1K-0402-F"
R12: "贴片电阻：10K-0402-F", Add into BOM=yes, Convert to PCB=yes, Device=10k, FootprintName=R0603, ModelId=6bd5cd867e9542ebae21caaf5d2d4c4d, ModelName=R0603, ModelTransform=v2:[2.410722045565656e-15,39.37007874015748,0,-39.37007874015748,2.410722045565656e-15,0,0,0,39.37007874015748,0,0,0], SymbolName=10k, UniqueId=gged69dc30bc6f01ca4
R13 R15: library part R, "贴片电阻：100K-0402-F"
R17 R45 R47 R48: library part RES, "贴片合金电阻：5MR-1206-F", Manufacturer="Generic Components", Class=Passive, PCB DECAL=0603-RES, Published=08/06/2000, Publisher="Altium Hobart Technology Centre", SubClass=Resistor
R18: library part Res1, "贴片电阻：2.2R-0402-F", LatestRevisionDate=17-Jul-2002, LatestRevisionNote="Re-released for DXP Platform.", PackageDescription="Axial Device, Thru-Hole; 2 Leads; 0.3 in Pin Spacing", PackageReference=AXIAL-0.3, Published=8-Jun-2000, Publisher="Altium Limited"
R19 R55 R56: library part RES, "贴片电阻：220K-0402-F", Manufacturer="Generic Components", Class=Passive, PCB DECAL=0603-RES, Published=08/06/2000, Publisher="Altium Hobart Technology Centre", SubClass=Resistor
R20: library part Res1, "贴片电阻：100K-0402-F", LatestRevisionDate=17-Jul-2002, LatestRevisionNote="Re-released for DXP Platform.", PackageDescription="Axial Device, Thru-Hole; 2 Leads; 0.3 in Pin Spacing", PackageReference=AXIAL-0.3, Published=8-Jun-2000, Publisher="Altium Limited"
R21: library part Res1, "贴片电阻：30K-0402-F", LatestRevisionDate=17-Jul-2002, LatestRevisionNote="Re-released for DXP Platform.", PackageDescription="Axial Device, Thru-Hole; 2 Leads; 0.3 in Pin Spacing", PackageReference=AXIAL-0.3, Published=8-Jun-2000, Publisher="Altium Limited"
R22: library part Res1, "贴片电阻：16mR-1206-F", LatestRevisionDate=17-Jul-2002, LatestRevisionNote="Re-released for DXP Platform.", PackageDescription="Axial Device, Thru-Hole; 2 Leads; 0.3 in Pin Spacing", PackageReference=AXIAL-0.3, Published=8-Jun-2000, Publisher="Altium Limited"
R49 R50: library part RES, "贴片电阻：2.2R-0402-F", Manufacturer="Generic Components", Class=Passive, PCB DECAL=0603-RES, Published=08/06/2000, Publisher="Altium Hobart Technology Centre", SubClass=Resistor
R51 R52 R53 R54 R57 R58: library part RES, "贴片电阻：1R-0402,+/-1% SMD", Manufacturer="Generic Components", Class=Passive, PCB DECAL=0603-RES, Published=08/06/2000, Publisher="Altium Hobart Technology Centre", SubClass=Resistor
RT1: library part RES-A, "插件NTC热敏电阻：10K 1% 3950 L：60mm", PCB DECAL=R.AI-6\1(1/8W)
TP2 TP3 TP4 TP5 TP6: library part TP
TP8: library part TEST, PCB DECAL=TPSM
U1: library part TD8113, "贴片IC：ME3131-SOT23-6", LCSC Assembly=Yes, Manufacturer=TMI, Manufacturer Part=STI3470, Contributor=wwjlisa, link=unknown, SMT Type=Extend, spicePre=U, spiceSymbolName=STI3470, Supplier=LCSC, Supplier Part=C478938
U2: library part SOT23-MCU, "贴片触摸：HD9210-SOT23-6"
U3: library part PY32F031, "贴片IC：PY32F030-QFN32-4*4", JLCPCB Part Class="Extended Part", Manufacturer=PUYA(普冉), Manufacturer Part=PY32F030K28U6TR, Add into BOM=yes, Convert to PCB=yes, Device=PY32F031, FootprintName=QFN-32_L5.0-W5.0-P0.50-TL-EP3.5, ModelId=595304ab79a843bfa03bdaf869386976, ModelName=QFN-32_L5.0-W5.0-H1.0-P0.50-TL-EP3.5, ModelTransform=v2:[39.37007874015748,0,0,0,39.37007874015748,0,0,0,39.37007874015748,0.001,0,0], Supplier=LCSC, Supplier Part=C3018718, SymbolName=PY32F031, UniqueId=gge62ac414b3116667d
U4: "贴片IC：SD3934-QFN52L6*6", PCB DECAL=QFN52-0.4
U5: JLCPCB Part Class="Extended Part", Manufacturer=PUYA(普冉), Add into BOM=yes, Convert to PCB=yes, Device=P25Q64H-SUH-IT, FootprintName=SOP-8_L5.3-W5.3-P1.27-LS8.0-BL, Manufacturer Part=P25Q64H-SUH-IT, ModelId=fc9b9a2dc0bb4458871072ce0a00885d, ModelName=SOP-8_L5.2-W5.3-H2.1-LS7.9-P1.27, ModelTransform=v2:[2.410722045565656e-15,39.37007874015748,0,-39.37007874015748,2.410722045565656e-15,0,0,0,39.37007874015748,0,0,0], Supplier=LCSC, Supplier Part=C414065, SymbolName=P25Q64H-SUH-IT, UniqueId=ggeec8bb7aad7322074
U6: library part SP1233FL, "贴片IC：SP1232F-SOP8"
U7 U8: library part SD59D31_QFN16, "贴片IC：SD59D31-QFN3x3_16", PCB DECAL=QFN16_3X3
TP11 TP12: PCB DECAL=TPSM
TYPE_C1 TYPE_C2 TYPE_C3: PCB DECAL=TYPEC

## Free pads (board coordinates)
  rect 3x2 hole 0.3 mask+0.102: 2(8.823,-10.018)
  rect 2x1.5 hole 0.5 mask+0.102: 2(26.123,-34.868) 2(26.123,-32.424) 2(26.123,-29.98)
  rect 2x1.5 hole 0.5: 2(26.123,-27.536)
  rect 1x1.5 hole 0.3 mask+0.102: 2(30.99,-34.833) 2(30.99,-32.39) 2(30.99,-29.946) 2(30.99,-27.503)
  rect 1.5x1.5 / inner rect 1.5x1 / far side rect 1.5x1.5 hole 0.3 mask+0.102: 2(33.39,-34.828) 2(33.39,-32.384) 2(33.39,-29.94)
  rect 1.5x1.5 / inner rect 0.3x0.3 / far side rect 1.5x1.5 hole 0.3 mask+0.102: 2(33.39,-27.496)
  rect 2x2.2 / inner rect 1x1 / far side rect 2x2.2 hole 0.5 mask+0.102: 2(58.215,-9.728) 2(61.79,-9.728)
  rect 2x2.2 hole 0.5 mask+0.102: 2(88.94,-9.728)
  round 1.8 / inner round 1.8 / far side round 2 hole 1: 5(15.298,-21.368)
  rect 6x2.5 smd far side mask+0.102: GND(51.72,-9.84) GND(76.15,-9.87)
  rect 6x2.5 / inner rect 0x0 / far side rect 0x0 all layers, no hole mask+0.102: GND(51.79,-9.878) GND(76.115,-9.878)

## Via types
v1: diameter 0.5, hole 0.3, Top Layer to Bottom Layer, tented both sides, 592 vias
v2: diameter 0.45, hole 0.3, Top Layer to Bottom Layer, tented both sides, 1 vias

## Nets (pads, with @x,y where several pads share a name; then routed paths per layer and width w, separated by ;. In a path a pad name is that pad's centre, name@x,y a point inside that pad or via, vN(x,y) a via of type N, cw(c..) or ccw(c..) an arc to the next point about the centre after c; other vN are vias at no path point)
AGND: C1.1 C3.1 C8.1 C12.1 C20.2 C22.2 C69.2 JUMP2.1 R19.1 RT1.2 U4.0
  other v1: 39.422,-28.06 40.84,-28.06 41.36,-28.06 38.687,-27.325 39.23,-27.325 39.76,-27.325 40.31,-27.325 40.83,-27.325 41.35,-27.325 35.33,-21.71 36.11,-20.86 34.48,-20.79 36.88,-20.1 35.26,-19.95 33.59,-19.85 37.55,-19.28 36.04,-19.18 32.88,-19.08 34.38,-19.02 36.65,-18.37 33.65,-18.33 35.16,-18.33 34.37,-17.6 35.9,-17.6 35.13,-16.87
BACK_LED: R14.1 U3.19 | length 14.2
  Top Layer w0.2: R14.1@6.61,-33.473 6.717,-33.473 v1(7.065,-33.126) ; U3.19@10.409,-26.009 11.019,-25.4 11.527,-25.4 12.64,-26.513 12.64,-30.59 v1(11.23,-32)
  Bottom Layer w0.2: v1(7.065,-33.126) 10.104,-33.126 v1(11.23,-32)
BOOT0: U3.31
BST1: 
BST1-1: 
BST2: 
BST2-1.: 
BST3: 
BUTTON: U2.1 U3.7 | length 17.7
  Top Layer w0.2: U3.7@7.722,-29.262 7.26,-29.724 7.26,-30.012 7.778,-30.53 v1(8.26,-30.53) ; U2.1@22.724,-30.732 22.75,-30.758 v1(22.75,-31.44)
  Bottom Layer w0.2: v1(8.26,-30.53) 21.84,-30.53 v1(22.75,-31.44)
CC1-1: 
CC1-2: 
CC1-3: 
CC1_1: 
CC1_2: 
CC1_3: 
CC1_4: 
CC2-1: 
CC2-2: 
CC2-3: 
CC2_1: 
CC2_2: 
CC2_3: 
CC2_4: 
COMP: 
COMP1: 
CSN: C22.1 R17.2 R22.2 R45.2 U4.5 U6.3 | length 63.3
  Top Layer w0.2: U4.5@37.814,-17.842 39.718,-15.938 C22.1@39.718,-15.761 39.718,-14.969 40.328,-14.36 v1(40.374,-14.36) ; R22.2@75.09,-22.26 75.09,-23.21 75.373,-23.493 v1(75.685,-23.493) ; v1(88.65,-15.95) 88.67,-15.93 U6.3@88.67,-14.885
  Mid-Layer 1 w0.2: v1(40.374,-14.36) 40.684,-14.67 52.401,-14.67 53.551,-13.52 58.014,-13.52 60.114,-15.62 71.53,-15.62 72.89,-16.98 72.89,-18.556 v1(74.64,-20.307) ; v1(75.685,-23.493) 75.685,-21.345 79.809,-17.221 87.379,-17.221 v1(88.65,-15.95)
CSP2: C20.1 R17.1 TYPE_C3. TYPE_C3.A1 TYPE_C3.A12 TYPE_C3.B1 TYPE_C3.B12 U4.2 | length 53
  Top Layer w0.2: U4.2@38.663,-18.691 40.498,-16.855 40.498,-16.399 40.463,-16.364 40.498,-16.329 40.498,-15.759 42.127,-14.13 42.49,-14.13 v1(42.5,-14.12) ; v1(73.73,-18.19) 73.74,-18.18 R17.1@73.74,-16.978
  Mid-Layer 1 w0.2: v1(42.5,-14.12) 42.581,-14.12 42.731,-14.27 52.236,-14.27 53.386,-13.12 58.179,-13.12 60.279,-15.22 71.696,-15.22 73.73,-17.254 v1(73.73,-18.19)
  Mid-Layer 2 w0.5: TYPE_C3.@67.435,-23.93 67.435,-24.245 68.38,-25.19 70.045,-25.19 TYPE_C3.B12@70.055,-25.18 70.91,-25.18 71.295,-24.795 TYPE_C3.@71.295,-23.93 TYPE_C3.@71.295,-19.93
  Bottom Layer w0.5: TYPE_C3.A1@68.665,-25.18 TYPE_C3.B12@70.055,-25.18
CSP3: C69.1 R45.1 U4.51 USBA1.4 | length 46.6
  Top Layer w0.2: U4.51@38.663,-20.105 38.84,-20.282 38.938,-20.38 39.3,-20.38 39.487,-20.193 39.487,-19.113 C69.1@41.282,-17.318 41.514,-17.55 42.06,-17.55 42.862,-16.748 42.862,-15.521 43.87,-14.513 v1(43.87,-13.72) ; R45.1@76.43,-16.978 76.47,-17.017 v1(76.47,-18.13)
  Mid-Layer 1 w0.2: v1(43.87,-13.72) 43.951,-13.72 44.101,-13.87 52.07,-13.87 53.22,-12.72 58.345,-12.72 60.445,-14.82 71.861,-14.82 75.171,-18.13 v1(76.47,-18.13)
CSP_1: 
CSP_2: 
CSP_3: 
CSP_4: 
D25_EN: U3.14
D25_INT: U3.15
D31_CSP1: C74.2 C82.2 L5.2 R47.2 R51.1 R53.1 | length 50
  Top Layer w0.2: v1@50.21,-13.02 50.212,-13.022 50.212,-13.573 R53.1@50.215,-13.575 ; R51.1@51.317,-13.575 v1@51.317,-13.113 ; v1(53.79,-30.45) R47.2@54.87,-30.45
  Mid-Layer 2 w0.2: v1@50.21,-13.02 48.88,-13.02 46.54,-15.36 46.54,-23.654 52.767,-29.882 53.318,-29.882 53.649,-30.213 53.649,-30.228 53.79,-30.369 v1(53.79,-30.45) ; v1(51.33,-12.92) 50.82,-13.43 48.98,-13.43 46.91,-15.5 46.91,-23.51 52.94,-29.54 53.55,-29.54 54.3,-30.29 54.3,-31.44 54.31,-31.45 v1(54.31,-31.467)
  other v1: 50.21,-12.92
D31_CSP2: C78.2 C83.2 L6.2 R48.2 R52.1 R54.1 | length 49.7
  Top Layer w0.2: R48.2@59.23,-30.45 59.26,-30.48 v1(60.26,-30.48) ; v1@63.39,-13.1 63.413,-13.123 R54.1@63.413,-13.57 ; R52.1@64.522,-13.57 64.55,-13.542 v1(64.55,-13.11) v1@64.55,-13.1
  Mid-Layer 2 w0.2: v1(59.43,-31.56) 59.511,-31.56 59.691,-31.38 61.47,-31.38 62.32,-30.53 62.32,-25.72 59.87,-23.27 59.87,-15.87 61.8,-13.94 63.72,-13.94 v1(64.55,-13.11) ; v1@60.25,-30.53 60.75,-31.03 61.26,-31.03 61.93,-30.36 61.93,-25.84 59.48,-23.39 59.48,-15.7 61.6,-13.58 62.92,-13.58 v1(63.39,-13.11) v1@63.309,-13.11
D31_EN1: U3.11
D31_EN2: U3.10
D31_INT1: U3.13
D31_INT2: U3.12
D31_VOUT1: C75.2 C76.2 C77.1 Q2.D R47.1 R57.1 | length 23.1
  Top Layer w0.2: v1(48,-12.92) 48.005,-12.925 48.005,-13.57 R57.1@48.009,-13.575 ; R47.1@52.02,-30.45 52.035,-30.435 v1(53.09,-30.435)
  Mid-Layer 2 w0.2: v1(48,-12.92) 48,-13.334 46.14,-15.194 46.14,-23.82 52.732,-30.412 53.067,-30.412 v1(53.09,-30.435)
D31_VOUT2: C79.2 C80.2 C81.1 Q1.D R48.1 R58.1 | length 21
  Top Layer w0.2: v1(61.024,-30.48) 62.05,-30.48 R48.1@62.08,-30.45 ; R58.1@61.197,-13.57 v1@61.197,-13.11
  Mid-Layer 2 w0.2: v1(61.024,-30.48) 61.53,-29.974 61.53,-26.006 59.08,-23.556 59.08,-15.534 61.23,-13.384 v1@61.23,-13.17
  other v1: 61.2,-13.11
DM-1: 
DM-2: 
DM-3: 
DM-4: 
DM_1: 
DM_2: 
DM_3: 
DM_4: 
DN0: ESD15.2 TYPE_C1.A7 TYPE_C1.B7 U4.43 | length 10.6
  Top Layer w0.15: U4.43@36.4,-22.368 37.015,-22.982 37.015,-23.194 37.316,-23.495 v1(37.316,-23.565)
  Mid-Layer 1 w0.15: TYPE_C1.A7@42.665,-21.48 43.165,-21.48 TYPE_C1.B7@44.065,-22.38
  Bottom Layer w0.15: v1(37.316,-23.565) 37.491,-23.74 38.34,-23.74 39.18,-22.9 39.18,-22 ESD15.2@39.93,-21.25 39.93,-21.3 40.29,-21.66 42.274,-21.66 42.455,-21.48 TYPE_C1.A7@42.665,-21.48
DN1: ESD10.2 TYPE_C2.A7 TYPE_C2.B7 U4.38 | length 31.9
  Top Layer w0.15: v1(34.392,-23.947) 34.392,-23.889 34.187,-23.684 34.187,-23.202 34.234,-23.155 34.234,-23.12 U4.38@34.42,-22.933
  Mid-Layer 1 w0.15: v1(34.392,-23.947) 34.418,-23.973 34.418,-24.293 39.06,-28.935 44.88,-28.935 49.11,-24.705 52.355,-24.705 53.36,-23.7 53.36,-21.88 v1(53.18,-21.7) ; TYPE_C2.A7@55.64,-21.48 56.54,-22.38 TYPE_C2.B7@57.04,-22.38
  Bottom Layer w0.15: ESD10.2@53.15,-21.103 ESD10.2@53.18,-21.133 ; v1(53.18,-21.7) ESD10.2@53.18,-21.133 ; TYPE_C2.A7@55.64,-21.48 55.37,-21.75 53.797,-21.75 ESD10.2@53.18,-21.133
DN2: ESD17.2 TYPE_C3.A7 TYPE_C3.B7 U4.34 | length 56
  Top Layer w0.15: v1(31.917,-22.803) 31.977,-22.743 32.384,-22.743 33.103,-22.024 33.103,-21.988 U4.34@33.289,-21.802
  Mid-Layer 1 w0.15: v1(31.917,-22.803) 31.811,-22.909 31.811,-23.666 38.48,-30.335 45.46,-30.335 49.69,-26.105 71.38,-26.105 72.43,-25.055 72.43,-23.01 v1(73.06,-22.38) ; TYPE_C3.A7@68.665,-21.48 69.152,-21.48 70.052,-22.38 TYPE_C3.B7@70.065,-22.38
  Bottom Layer w0.15: TYPE_C3.B7@70.065,-22.38 70.188,-22.38 70.478,-22.09 72.123,-22.09 ESD17.2@72.73,-22.697
DN3: ESD5.2 U4.28 USBA1.2 | length 65
  Mid-Layer 1 w0.15: v1(35.555,-30.107) 36.241,-30.107 37.869,-31.735 46.04,-31.735 48.335,-29.44 72.28,-29.44 79.595,-22.125 80.069,-22.125 USBA1.2@80.865,-22.921
  Mid-Layer 2 w0.15: v1(31.196,-20.341) 31.196,-20.487 30.898,-20.785 30.898,-23.138 32.6,-24.84 34.415,-24.84 35.38,-25.805 35.38,-28.84 35.03,-29.19 35.03,-29.625 35.513,-30.107 v1(35.555,-30.107)
  Bottom Layer w0.15: USBA1.2@80.865,-22.921 80.906,-22.88 ESD5.2@82.38,-22.88
DP0: ESD14.2 TYPE_C1.A6 TYPE_C1.B6 U4.42 | length 10.4
  Top Layer w0.15: U4.42@36.117,-22.65 36.616,-23.15 v1(36.616,-23.536)
  Bottom Layer w0.15: v1(36.616,-23.536) 36.616,-23.608 37.098,-24.09 38.485,-24.09 39.53,-23.045 39.53,-22.78 40.205,-22.105 40.255,-22.105 40.35,-22.01 42.262,-22.01 42.631,-22.38 TYPE_C1.A6@42.665,-22.38 43.565,-21.48 TYPE_C1.B6@44.065,-21.48
DP1: ESD9.2 TYPE_C2.A6 TYPE_C2.B6 U4.41 | length 31.3
  Top Layer w0.15: v1(35.081,-23.825) 35.159,-23.825 35.926,-23.058 35.926,-23.025 U4.41@35.835,-22.933
  Mid-Layer 1 w0.15: v1(35.081,-23.825) 35.081,-24.461 39.205,-28.585 44.735,-28.585 48.965,-24.355 52.205,-24.355 52.835,-23.725 v1(52.835,-23.32) ; TYPE_C2.A6@55.64,-22.38 56.26,-23 57.24,-23 57.615,-22.625 57.615,-22.055 TYPE_C2.B6@57.04,-21.48 TYPE_C2.B6@57.04,-21.567
  Bottom Layer w0.15: v1(52.835,-23.32) 52.835,-22.972 53.11,-22.697 53.153,-22.697 53.75,-22.1 55.36,-22.1 TYPE_C2.A6@55.64,-22.38
DP2: ESD16.2 TYPE_C3.A6 TYPE_C3.B6 U4.35 | length 54.4
  Top Layer w0.15: v1(32.441,-23.268) 32.441,-23.216 U4.35@33.572,-22.085
  Mid-Layer 1 w0.15: v1(32.441,-23.268) 32.441,-23.801 38.625,-29.985 45.315,-29.985 49.545,-25.755 71.235,-25.755 72.07,-24.92 72.07,-21.76 72.392,-21.438 v1(72.396,-21.438)
  Bottom Layer w0.15: TYPE_C3.A6@68.665,-22.38 68.688,-22.38 69.588,-21.48 TYPE_C3.B6@70.065,-21.48 70.287,-21.48 70.547,-21.74 72.093,-21.74 ESD16.2@72.396,-21.438
DP3: ESD4.2 U4.29 USBA1.3 | length 64.3
  Top Layer w0.15: v1(31.423,-21.003) 31.423,-20.875 31.875,-20.423 U4.29@31.875,-20.388
  Mid-Layer 1 w0.15: v1(35.555,-29.407) 36.036,-29.407 38.014,-31.385 45.895,-31.385 48.23,-29.05 72.175,-29.05 79.45,-21.775 80.011,-21.775 USBA1.3@80.865,-20.921
  Mid-Layer 2 w0.15: v1(31.423,-21.003) 31.423,-21.091 31.248,-21.266 31.248,-22.993 32.745,-24.49 34.56,-24.49 35.73,-25.66 35.73,-29.144 35.555,-29.319 v1(35.555,-29.407)
  Bottom Layer w0.15: USBA1.3@80.865,-20.921 80.896,-20.89 ESD4.2@82.38,-20.89
DP-1: 
DP-2: 
DP-3: 
DP-4: 
DP_1: 
DP_2: 
DP_3: 
DP_4: 
DRV_C1: 
DRV_C2: 
DRV_C3: 
DRV_C4: 
EN1: 
EN1-1: 
EN2: 
EN-2: 
FB11: R20.1 R21.1 U4.50 U6.1 | length 63.3
  Top Layer w0.2: U4.50@38.38,-20.388 38.772,-20.78 39.466,-20.78 40.037,-20.208 40.037,-19.128 41.216,-17.95 42.226,-17.95 43.262,-16.913 43.262,-15.686 44.55,-14.399 v1@44.55,-13.46 ; R21.1@89.52,-13.21 R20.1@90.535,-13.21 90.535,-13.635 91.21,-14.31 U6.1@91.21,-14.885
  Mid-Layer 1 w0.2: v1(44.61,-13.31) 44.77,-13.47 51.904,-13.47 53.054,-12.32 58.511,-12.32 60.611,-14.42 72.027,-14.42 73.237,-15.63 79.14,-15.63 80.04,-16.53 86.75,-16.53 v1(90.06,-13.22)
FB_1: 
FB_2: 
FB_3: 
FLASH_CLK: U3.26 U5.6 | length 5.1
  Top Layer w0.2: U5.6@6.49,-20.305 6.49,-23.646 U3.26@7.722,-24.878
FLASH_CS: U3.29 U5.1 | length 16.3
  Top Layer w0.2: v1(4.67,-21.73) 4.67,-23.523 U3.29@6.874,-25.726 ; U5.1@9.03,-14.605 9.1,-14.675 v1(9.1,-15.8)
  Bottom Layer w0.2: v1(4.67,-21.73) 4.67,-17.33 7.05,-14.95 8.25,-14.95 v1(9.1,-15.8)
FLASH_MISO: U3.27 U5.2 | length 12
  Top Layer w0.2: v1(5.88,-21.72) 5.86,-21.74 5.86,-23.581 U3.27@7.439,-25.161 ; v1(7.751,-15.816) 7.751,-14.614 U5.2@7.76,-14.605
  Bottom Layer w0.2: v1(5.88,-21.72) 5.88,-17.69 7.751,-15.819 v1(7.751,-15.816)
FLASH_MOSI: U3.28 U5.5 | length 5.9
  Top Layer w0.2: U5.5@5.22,-20.305 5.22,-23.507 U3.28@7.156,-25.444
G0: Q2.G U4.18 | length 25
  Top Layer w0.2: U4.18@33.572,-16.711 33.111,-16.25 33.111,-15.985 33.84,-15.256 v1(33.93,-15.256) ; v1(45.481,-26.225) 45.481,-26.306 45.742,-26.568 45.742,-26.686 Q2.G@45.895,-26.839
  Mid-Layer 1 w0.2: v1(33.93,-15.256) 33.93,-15.699 32.19,-17.439 32.19,-20.404 34.646,-22.86 35.46,-22.86 36.031,-23.432 36.031,-24.315 38.091,-26.375 45.331,-26.375 v1(45.481,-26.225)
G1: Q1.G U4.20 | length 41.7
  Top Layer w0.2: v1(32.227,-15.409) 32.311,-15.493 32.311,-16.581 U4.20@33.006,-17.276 ; v1(59.89,-25.16) 60.135,-24.915 Q1.G@60.135,-24.879
  Mid-Layer 1 w0.2: v1(32.227,-15.409) 32.214,-15.396 32.214,-14.626 32.629,-14.211 33.663,-14.211 33.686,-14.234 36.952,-17.5 45.35,-17.5 46.56,-18.71 51.257,-18.71 52.487,-17.48 53.551,-17.48 54.711,-16.32 56.843,-16.32 59.11,-18.587 59.11,-22.37 60.55,-23.81 60.55,-24.5 v1(59.89,-25.16)
G2: Q3.G U4.22 | length 48.4
  Top Layer w0.2: v1(31.28,-16.44) 31.337,-16.498 31.337,-16.739 U4.22@32.44,-17.842 ; v1(64.23,-24.92) 64.501,-25.191 64.501,-26.711 Q3.G@64.768,-26.977
  Mid-Layer 1 w0.2: v1(31.28,-16.44) 31.211,-16.371 31.211,-14.498 32.298,-13.411 33.994,-13.411 37.283,-16.7 45.681,-16.7 46.891,-17.91 50.926,-17.91 52.156,-16.68 53.22,-16.68 54.38,-15.52 57.174,-15.52 59.91,-18.256 59.91,-21.704 63.126,-24.92 v1(64.23,-24.92)
G3: Q4.G U4.24 | length 70.3
  Top Layer w0.2: v1(30.84,-17.69) 30.921,-17.69 30.982,-17.752 31.218,-17.752 U4.24@31.875,-18.408 ; v1(86.43,-26.74) 86.594,-26.576 Q4.G@86.888,-26.576
  Mid-Layer 1 w0.2: v1(36.425,-31.034) 36.483,-31.091 36.691,-31.091 37.71,-32.11 73.894,-32.11 79.114,-26.89 86.199,-26.89 86.349,-26.74 v1(86.43,-26.74)
  Mid-Layer 2 w0.2: v1(30.84,-17.69) 30.918,-17.69 31.43,-18.203 31.43,-18.83 36.066,-23.467 36.066,-24.9 36.505,-25.339 36.505,-30.715 36.483,-30.737 36.483,-30.976 v1(36.425,-31.034)